# Altium PCB MONO65_A2.PcbDoc (part 4 of 4)
Units mm, origin at the board's own origin, x right, y up, seen from the top; angles counter-clockwise.
Board outline 304.6 x 95.05 mm, 2 copper layers (Component Side, Solder Side), stack 1.586 mm thick; 275 components, 185 nets, 1029 pads, 156 vias.
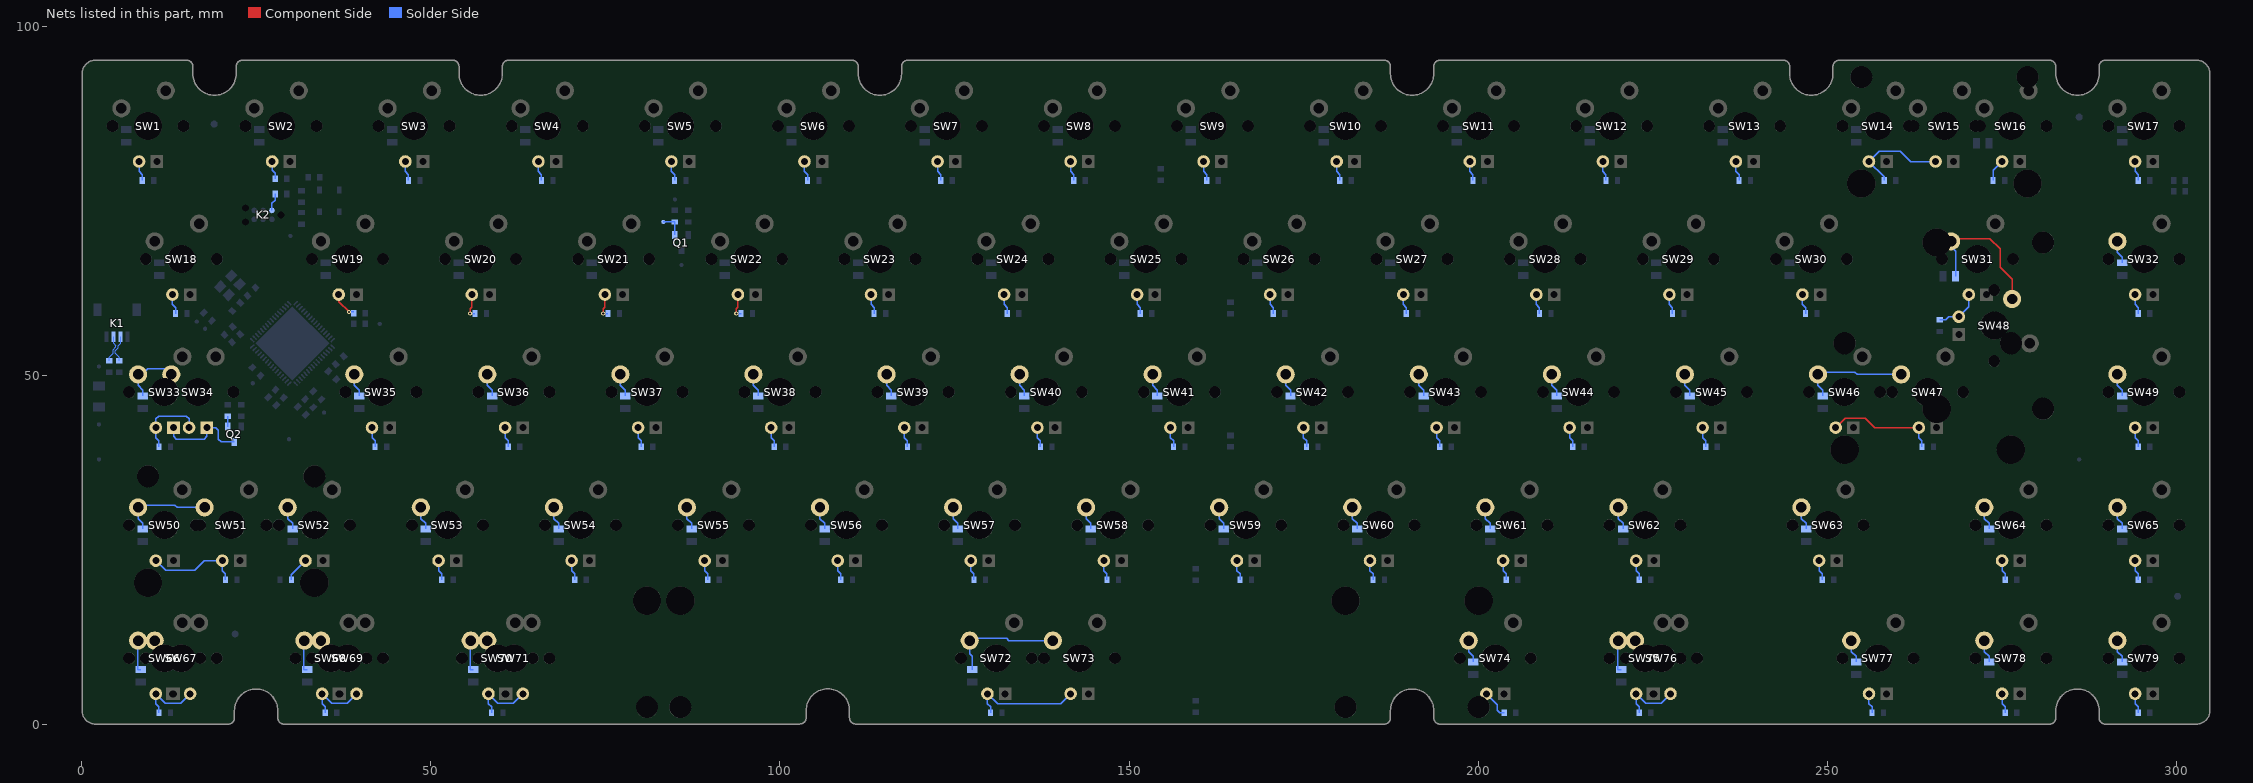
[diagram p3: the nets of this part, all layers, seen from the top]

## Via types
v1: diameter 0.6, hole 0.3, Component Side to Solder Side, tented both sides, 107 vias
v2: diameter 0.5, hole 0.2, Component Side to Solder Side, tented top, 49 vias

## Nets (pads, with @x,y where several pads share a name; then routed paths per layer and width w, separated by ;. In a path a pad name is that pad's centre, name@x,y a point inside that pad or via, vN(x,y) a via of type N, cw(c..) or ccw(c..) an arc to the next point about the centre after c; other vN are vias at no path point) (continued)
NetD32_2: D32.2 SW32.1 | length 3.3
  Solder Side w0.2: SW32.1@291.465,69.215 291.465,67.635 292.15,66.95 D32.2@292.15,66.15
NetD33_2: D33.2 SW33.1 SW34.1 | length 8.8
  Solder Side w0.2: D33.2@8.782,47.1 8.782,47.9 8.096,48.585 SW33.1@8.096,50.165 8.719,50.165 9.504,50.95 12.074,50.95 SW34.1@12.859,50.165
NetD35_2: D35.2 SW35.1 | length 3.3
  Solder Side w0.2: SW35.1@39.053,50.165 39.053,48.585 39.738,47.9 D35.2@39.738,47.1
NetD36_2: D36.2 SW36.1 | length 3.3
  Solder Side w0.2: SW36.1@58.103,50.165 58.103,48.585 58.788,47.9 D36.2@58.788,47.1
NetD37_2: D37.2 SW37.1 | length 3.3
  Solder Side w0.2: SW37.1@77.153,50.165 77.153,48.585 77.838,47.9 D37.2@77.838,47.1
NetD38_2: D38.2 SW38.1 | length 3.3
  Solder Side w0.2: SW38.1@96.203,50.165 96.203,48.585 96.888,47.9 D38.2@96.888,47.1
NetD39_2: D39.2 SW39.1 | length 3.3
  Solder Side w0.2: SW39.1@115.253,50.165 115.253,48.585 115.938,47.9 D39.2@115.938,47.1
NetD40_2: D40.2 SW40.1 | length 3.3
  Solder Side w0.2: SW40.1@134.303,50.165 134.303,48.585 134.988,47.9 D40.2@134.988,47.1
NetD41_2: D41.2 SW41.1 | length 3.3
  Solder Side w0.2: SW41.1@153.353,50.165 153.353,48.585 154.038,47.9 D41.2@154.038,47.1
NetD42_2: D42.2 SW42.1 | length 3.3
  Solder Side w0.2: SW42.1@172.403,50.165 172.403,48.585 173.088,47.9 D42.2@173.088,47.1
NetD43_2: D43.2 SW43.1 | length 3.3
  Solder Side w0.2: SW43.1@191.453,50.165 191.453,48.585 192.138,47.9 D43.2@192.138,47.1
NetD44_2: D44.2 SW44.1 | length 3.3
  Solder Side w0.2: SW44.1@210.503,50.165 210.503,48.585 211.188,47.9 D44.2@211.188,47.1
NetD45_2: D45.2 SW45.1 | length 3.3
  Solder Side w0.2: SW45.1@229.553,50.165 229.553,48.585 230.238,47.9 D45.2@230.238,47.1
NetD46_2: D46.2 SW46.1 SW47.1 | length 15.5
  Solder Side w0.2: D46.2@249.288,47.1 249.288,47.9 248.603,48.585 SW46.1@248.603,50.165 248.938,50.5 253.894,50.5 254.229,50.165 SW47.1@260.509,50.165
NetD48_2: D48.2 SW31.1 SW48.1 | length 20.6
  Component Side w0.2: SW31.1@267.929,69.215 268.289,69.575 273.225,69.575 274.675,68.125 274.675,65.5 276.384,63.791 SW48.1@276.384,60.96
  Solder Side w0.2: SW31.1@267.652,69.215 267.652,68.435 268.311,67.777 D48.2@268.311,64.225
NetD49_2: D49.2 SW49.1 | length 3.3
  Solder Side w0.2: SW49.1@291.465,50.165 291.465,48.585 292.15,47.9 D49.2@292.15,47.1
NetD50_2: D50.2 SW50.1 SW51.1 | length 13.2
  Solder Side w0.2: D50.2@8.782,28.05 8.782,28.85 8.097,29.535 SW50.1@8.097,31.115 8.432,31.45 13.388,31.45 13.723,31.115 SW51.1@17.622,31.115
NetD52_2: D52.2 SW52.1 | length 3.3
  Solder Side w0.2: SW52.1@29.528,31.115 29.528,29.535 30.213,28.85 D52.2@30.213,28.05
NetD53_2: D53.2 SW53.1 | length 3.3
  Solder Side w0.2: SW53.1@48.578,31.115 48.578,29.535 49.263,28.85 D53.2@49.263,28.05
NetD54_2: D54.2 SW54.1 | length 3.3
  Solder Side w0.2: SW54.1@67.628,31.115 67.628,29.535 68.313,28.85 D54.2@68.313,28.05
NetD55_2: D55.2 SW55.1 | length 3.3
  Solder Side w0.2: SW55.1@86.678,31.115 86.678,29.535 87.363,28.85 D55.2@87.363,28.05
NetD56_2: D56.2 SW56.1 | length 3.3
  Solder Side w0.2: SW56.1@105.728,31.115 105.728,29.535 106.413,28.85 D56.2@106.413,28.05
NetD57_2: D57.2 SW57.1 | length 3.3
  Solder Side w0.2: SW57.1@124.778,31.115 124.778,29.535 125.463,28.85 D57.2@125.463,28.05
NetD58_2: D58.2 SW58.1 | length 3.3
  Solder Side w0.2: SW58.1@143.828,31.115 143.828,29.535 144.513,28.85 D58.2@144.513,28.05
NetD59_2: D59.2 SW59.1 | length 3.3
  Solder Side w0.2: SW59.1@162.878,31.115 162.878,29.535 163.563,28.85 D59.2@163.563,28.05
NetD60_2: D60.2 SW60.1 | length 3.3
  Solder Side w0.2: SW60.1@181.928,31.115 181.928,29.535 182.613,28.85 D60.2@182.613,28.05
NetD61_2: D61.2 SW61.1 | length 3.3
  Solder Side w0.2: SW61.1@200.978,31.115 200.978,29.535 201.663,28.85 D61.2@201.663,28.05
NetD62_2: D62.2 SW62.1 | length 3.3
  Solder Side w0.2: SW62.1@220.028,31.115 220.028,29.535 220.713,28.85 D62.2@220.713,28.05
NetD63_2: D63.2 SW63.1 | length 3.3
  Solder Side w0.2: SW63.1@246.222,31.115 246.222,29.535 246.907,28.85 D63.2@246.907,28.05
NetD64_2: D64.2 SW64.1 | length 3.3
  Solder Side w0.2: SW64.1@272.416,31.115 272.416,29.535 273.101,28.85 D64.2@273.101,28.05
NetD65_2: D65.2 SW65.1 | length 3.3
  Solder Side w0.2: SW65.1@291.465,31.115 291.465,29.535 292.15,28.85 D65.2@292.15,28.05
NetD66_2: D66.2 SW66.1 SW67.1 | length 7
  Component Side w0.3: SW66.1@8.097,12.065 SW67.1@10.478,12.065
  Solder Side w0.2: SW66.1@8.097,12.065 8.025,11.993 8.025,7.95 8.075,7.9 D66.2@8.482,7.9
NetD68_2: D68.2 SW68.1 SW69.1 | length 7
  Component Side w0.2: SW68.1@31.909,12.065 SW69.1@34.29,12.065
  Solder Side w0.2: SW68.1@31.909,12.065 31.837,11.993 31.837,7.95 31.887,7.9 D68.2@32.294,7.9
NetD70_2: D70.2 SW70.1 SW71.1 | length 7
  Component Side w0.2: SW70.1@55.721,12.065 SW71.1@58.102,12.065
  Solder Side w0.2: SW70.1@55.721,12.065 55.649,11.993 55.649,7.95 55.699,7.9 D70.2@56.106,7.9
NetD72_2: D72.2 SW72.1 SW73.1 | length 16.5
  Solder Side w0.2: D72.2@127.544,7.9 127.544,9.8 127.159,10.185 SW72.1@127.159,12.065 127.494,12.4 132.45,12.4 132.785,12.065 SW73.1@139.065,12.065
NetD74_2: D74.2 SW74.1 | length 3.3
  Solder Side w0.2: SW74.1@198.597,12.065 198.597,10.485 199.282,9.8 D74.2@199.282,9
NetD75_2: D75.2 SW75.1 SW76.1 | length 7
  Component Side w0.3: SW75.1@220.028,12.065 SW76.1@222.409,12.065
  Solder Side w0.2: SW75.1@220.028,12.065 219.956,11.993 219.956,7.95 220.006,7.9 D75.2@220.413,7.9
NetD77_2: D77.2 SW77.1 | length 3.3
  Solder Side w0.2: SW77.1@253.365,12.065 253.365,10.485 254.051,9.8 D77.2@254.051,9
NetD78_2: D78.2 SW78.1 | length 3.3
  Solder Side w0.2: SW78.1@272.415,12.065 272.415,10.485 273.1,9.8 D78.2@273.1,9
NetD79_2: D79.2 SW79.1 | length 3.3
  Solder Side w0.2: SW79.1@291.465,12.065 291.465,10.485 292.15,9.8 D79.2@292.15,9
NetK2_2: K2.2 R7.2 | length 2.6
  Solder Side w0.2: K2.2@27.27,73.635 27.27,74.651 27.75,75.131 R7.2@27.75,76
NetQ1_1: Q1.1 R13.2 TP12.1 | length 3.5
  Solder Side w0.2: TP12.1@83.3,72 R13.2@84.95,72 Q1.1@84.95,70.125
NetQ2_1: Q2.1 R15.2 | length 1.5
  Solder Side w0.2: Q2.1@20.95,42.7 R15.2@20.95,44.175
NetQ2_3: Q2.3 SW33.4 SW34.4 | length 13.2
  Solder Side w0.2: SW33.4@13.176,42.545 13.176,41.284 13.571,40.89 17.545,40.89 17.939,41.284 SW34.4@17.939,42.545 19.255,42.545 19.608,42.192 19.608,40.9 20.008,40.5 Q2.3@21.9,40.5
NetR11_2: R11.2 SW33.3 SW34.3 | length 10.5
  Solder Side w0.2: R11.2@11.082,39.825 11.082,40.681 10.636,41.127 SW33.3@10.636,42.545 10.636,43.806 11.031,44.2 15.005,44.2 15.399,43.806 SW34.3@15.399,42.545
NetR17_2: R17.2 SW1.3 | length 2.9
  Solder Side w0.2: SW1.3@8.255,80.645 8.255,79.227 8.7,78.781 R17.2@8.7,77.925
NetR18_2: R18.2 SW2.3 | length 2.6
  Solder Side w0.2: SW2.3@27.305,80.645 27.305,79.395 27.75,78.95 R18.2@27.75,78.2
NetR19_2: R19.2 SW3.3 | length 2.9
  Solder Side w0.2: SW3.3@46.355,80.645 46.355,79.227 46.8,78.781 R19.2@46.8,77.925
NetR20_2: R20.2 SW4.3 | length 2.9
  Solder Side w0.2: SW4.3@65.405,80.645 65.405,79.227 65.85,78.781 R20.2@65.85,77.925
NetR21_2: R21.2 SW5.3 | length 2.9
  Solder Side w0.2: SW5.3@84.455,80.645 84.455,79.227 84.9,78.781 R21.2@84.9,77.925
NetR22_2: R22.2 SW6.3 | length 2.9
  Solder Side w0.2: SW6.3@103.505,80.645 103.505,79.227 103.95,78.781 R22.2@103.95,77.925
NetR23_2: R23.2 SW7.3 | length 2.9
  Solder Side w0.2: SW7.3@122.555,80.645 122.555,79.227 123,78.781 R23.2@123,77.925
NetR24_2: R24.2 SW8.3 | length 2.9
  Solder Side w0.2: SW8.3@141.605,80.645 141.605,79.227 142.05,78.781 R24.2@142.05,77.925
NetR25_2: R25.2 SW9.3 | length 2.9
  Solder Side w0.2: SW9.3@160.655,80.645 160.655,79.227 161.1,78.781 R25.2@161.1,77.925
NetR26_2: R26.2 SW10.3 | length 2.9
  Solder Side w0.2: SW10.3@179.705,80.645 179.705,79.227 180.15,78.781 R26.2@180.15,77.925
NetR27_2: R27.2 SW11.3 | length 2.9
  Solder Side w0.2: SW11.3@198.755,80.645 198.755,79.227 199.2,78.781 R27.2@199.2,77.925
NetR28_2: R28.2 SW12.3 | length 2.9
  Solder Side w0.2: SW12.3@217.805,80.645 217.805,79.227 218.25,78.781 R28.2@218.25,77.925
NetR29_2: R29.2 SW13.3 | length 2.9
  Solder Side w0.2: SW13.3@236.855,80.645 236.855,79.227 237.3,78.781 R29.2@237.3,77.925
NetR30_2: R30.2 SW14.3 SW15.3 | length 14.3
  Solder Side w0.2: R30.2@258.075,77.925 258.075,78.475 SW14.3@255.905,80.645 257.36,82.1 260.4,82.1 261.855,80.645 SW15.3@265.43,80.645
NetR32_2: R32.2 SW17.3 | length 2.9
  Solder Side w0.2: SW17.3@294.005,80.645 294.005,79.227 294.45,78.781 R32.2@294.45,77.925
NetR33_2: R33.2 SW18.3 | length 2.9
  Solder Side w0.2: SW18.3@13.017,61.595 13.017,60.177 13.463,59.731 R33.2@13.462,58.875
NetR34_2: R34.2 SW19.3 | length 3.8
  Component Side w0.2: SW19.3@36.83,61.595 36.83,60.57 v1(38.3,59.1)
  Solder Side w0.2: v1(38.3,59.1) R34.2@38.975,59.1
NetR35_2: R35.2 SW20.3 | length 3.5
  Component Side w0.2: v1(55.65,58.875) 55.65,59.57 55.88,59.8 SW20.3@55.88,61.595
  Solder Side w0.2: v1(55.65,58.875) R35.2@56.325,58.875
NetR36_2: R36.2 SW21.3 | length 3.5
  Component Side w0.2: v1(74.7,58.875) 74.7,59.57 74.93,59.8 SW21.3@74.93,61.595
  Solder Side w0.2: v1(74.7,58.875) R36.2@75.375,58.875
NetR37_2: R37.2 SW22.3 | length 3.5
  Component Side w0.2: v1(93.75,58.875) 93.75,59.57 93.98,59.8 SW22.3@93.98,61.595
  Solder Side w0.2: v1(93.75,58.875) R37.2@94.425,58.875
NetR38_2: R38.2 SW23.3 | length 2.9
  Solder Side w0.2: SW23.3@113.03,61.595 113.03,60.177 113.475,59.731 R38.2@113.475,58.875
NetR39_2: R39.2 SW24.3 | length 2.9
  Solder Side w0.2: SW24.3@132.08,61.595 132.08,60.177 132.525,59.731 R39.2@132.525,58.875
NetR40_2: R40.2 SW25.3 | length 2.9
  Solder Side w0.2: SW25.3@151.13,61.595 151.13,60.177 151.575,59.731 R40.2@151.575,58.875
NetR41_2: R41.2 SW26.3 | length 2.9
  Solder Side w0.2: SW26.3@170.18,61.595 170.18,60.177 170.625,59.731 R41.2@170.625,58.875
NetR42_2: R42.2 SW27.3 | length 2.9
  Solder Side w0.2: SW27.3@189.23,61.595 189.23,60.177 189.675,59.731 R42.2@189.675,58.875
NetR43_2: R43.2 SW28.3 | length 2.9
  Solder Side w0.2: SW28.3@208.28,61.595 208.28,60.177 208.725,59.731 R43.2@208.725,58.875
NetR44_2: R44.2 SW29.3 | length 2.9
  Solder Side w0.2: SW29.3@227.33,61.595 227.33,60.177 227.775,59.731 R44.2@227.775,58.875
NetR45_2: R45.2 SW30.3 | length 2.9
  Solder Side w0.2: SW30.3@246.38,61.595 246.38,60.177 246.825,59.731 R45.2@246.825,58.875
NetR46_2: R46.2 SW16.3 | length 3.3
  Solder Side w0.2: R46.2@273.675,77.925 273.675,79.365 SW16.3@274.955,80.645
NetR47_2: R47.2 SW32.3 | length 2.9
  Solder Side w0.2: SW32.3@294.005,61.595 294.005,60.177 294.45,59.731 R47.2@294.45,58.875
NetR48_2: R48.2 SW35.3 | length 2.9
  Solder Side w0.2: SW35.3@41.593,42.545 41.593,41.127 42.038,40.681 R48.2@42.038,39.825
NetR49_2: R49.2 SW36.3 | length 2.9
  Solder Side w0.2: SW36.3@60.643,42.545 60.643,41.127 61.088,40.681 R49.2@61.088,39.825
NetR50_2: R50.2 SW37.3 | length 2.9
  Solder Side w0.2: SW37.3@79.693,42.545 79.693,41.127 80.138,40.681 R50.2@80.138,39.825
NetR51_2: R51.2 SW38.3 | length 2.9
  Solder Side w0.2: SW38.3@98.743,42.545 98.743,41.127 99.188,40.681 R51.2@99.188,39.825
NetR52_2: R52.2 SW39.3 | length 2.9
  Solder Side w0.2: SW39.3@117.793,42.545 117.793,41.127 118.238,40.681 R52.2@118.238,39.825
NetR53_2: R53.2 SW40.3 | length 2.9
  Solder Side w0.2: SW40.3@136.843,42.545 136.843,41.127 137.288,40.681 R53.2@137.288,39.825
NetR54_2: R54.2 SW41.3 | length 2.9
  Solder Side w0.2: SW41.3@155.893,42.545 155.893,41.127 156.338,40.681 R54.2@156.338,39.825
NetR55_2: R55.2 SW42.3 | length 2.9
  Solder Side w0.2: SW42.3@174.943,42.545 174.943,41.127 175.388,40.681 R55.2@175.388,39.825
NetR56_2: R56.2 SW43.3 | length 2.9
  Solder Side w0.2: SW43.3@193.993,42.545 193.993,41.127 194.438,40.681 R56.2@194.438,39.825
NetR57_2: R57.2 SW44.3 | length 2.9
  Solder Side w0.2: SW44.3@213.043,42.545 213.043,41.127 213.488,40.681 R57.2@213.488,39.825
NetR58_2: R58.2 SW45.3 | length 2.9
  Solder Side w0.2: SW45.3@232.093,42.545 232.093,41.127 232.538,40.681 R58.2@232.538,39.825
NetR59_2: R59.2 SW46.3 SW47.3 | length 15.9
  Component Side w0.2: SW46.3@251.143,42.545 252.498,43.9 255.4,43.9 256.755,42.545 SW47.3@263.049,42.545
  Solder Side w0.2: SW47.3@263.049,42.545 263.049,41.127 263.494,40.681 R59.2@263.494,39.825
NetR61_2: R61.2 SW31.3 SW48.3 | length 6.7
  Solder Side w0.2: R61.2@266.044,57.975 266.9,57.975 267.346,58.42 SW48.3@268.764,58.42 270.192,59.848 SW31.3@270.192,61.595
NetR63_2: R63.2 SW49.3 | length 2.9
  Solder Side w0.2: SW49.3@294.005,42.545 294.005,41.127 294.45,40.681 R63.2@294.45,39.825
NetR64_2: R64.2 SW50.3 SW51.3 | length 13.6
  Solder Side w0.2: SW50.3@10.637,23.495 12.032,22.1 16.2,22.1 17.595,23.495 SW51.3@20.162,23.495 20.162,22.077 20.607,21.631 R64.2@20.607,20.775
NetR66_2: R66.2 SW52.3 | length 3.6
  Solder Side w0.2: R66.2@30.057,20.775 30.057,21.484 SW52.3@32.068,23.495
NetR67_2: R67.2 SW53.3 | length 2.9
  Solder Side w0.2: SW53.3@51.118,23.495 51.118,22.077 51.563,21.631 R67.2@51.563,20.775
NetR68_2: R68.2 SW54.3 | length 2.9
  Solder Side w0.2: SW54.3@70.168,23.495 70.168,22.077 70.613,21.631 R68.2@70.613,20.775
NetR69_2: R69.2 SW55.3 | length 2.9
  Solder Side w0.2: SW55.3@89.218,23.495 89.218,22.077 89.663,21.631 R69.2@89.663,20.775
NetR70_2: R70.2 SW56.3 | length 2.9
  Solder Side w0.2: SW56.3@108.268,23.495 108.268,22.077 108.713,21.631 R70.2@108.713,20.775
NetR71_2: R71.2 SW57.3 | length 2.9
  Solder Side w0.2: SW57.3@127.318,23.495 127.318,22.077 127.763,21.631 R71.2@127.763,20.775
NetR72_2: R72.2 SW58.3 | length 2.9
  Solder Side w0.2: SW58.3@146.368,23.495 146.368,22.077 146.813,21.631 R72.2@146.813,20.775
NetR73_2: R73.2 SW59.3 | length 2.9
  Solder Side w0.2: SW59.3@165.418,23.495 165.418,22.077 165.863,21.631 R73.2@165.863,20.775
NetR74_2: R74.2 SW60.3 | length 2.9
  Solder Side w0.2: SW60.3@184.468,23.495 184.468,22.077 184.913,21.631 R74.2@184.913,20.775
NetR75_2: R75.2 SW61.3 | length 2.9
  Solder Side w0.2: SW61.3@203.518,23.495 203.518,22.077 203.963,21.631 R75.2@203.963,20.775
NetR76_2: R76.2 SW62.3 | length 2.9
  Solder Side w0.2: SW62.3@222.568,23.495 222.568,22.077 223.013,21.631 R76.2@223.013,20.775
NetR77_2: R77.2 SW63.3 | length 2.9
  Solder Side w0.2: SW63.3@248.762,23.495 248.762,22.077 249.207,21.631 R77.2@249.207,20.775
NetR78_2: R78.2 SW64.3 | length 2.9
  Solder Side w0.2: SW64.3@274.956,23.495 274.956,22.077 275.401,21.631 R78.2@275.401,20.775
NetR79_2: R79.2 SW65.3 | length 2.9
  Solder Side w0.2: SW65.3@294.005,23.495 294.005,22.077 294.45,21.631 R79.2@294.45,20.775
NetR80_2: R80.2 SW66.3 SW67.3 | length 8.9
  Solder Side w0.2: R80.2@11.082,1.725 11.082,2.581 10.637,3.027 SW66.3@10.637,4.445 11.982,3.1 14.213,3.1 SW67.3@15.558,4.445
NetR82_2: R82.2 SW68.3 SW69.3 | length 8.9
  Solder Side w0.2: R82.2@34.894,1.725 34.894,2.581 34.449,3.027 SW68.3@34.449,4.445 35.794,3.1 38.025,3.1 SW69.3@39.37,4.445
NetR84_2: R84.2 SW70.3 SW71.3 | length 8.9
  Solder Side w0.2: R84.2@58.706,1.725 58.706,2.581 58.261,3.027 SW70.3@58.261,4.445 59.606,3.1 61.837,3.1 SW71.3@63.182,4.445
NetR86_2: R86.2 SW72.3 SW73.3 | length 16
  Solder Side w0.2: R86.2@130.144,1.725 130.144,2.581 129.699,3.027 SW72.3@129.699,4.445 131.144,3 140.16,3 SW73.3@141.605,4.445
NetR88_2: R88.2 SW74.3 | length 4.1
  Solder Side w0.2: SW74.3@201.137,4.445 202.675,2.907 202.675,2.1 203.05,1.725 R88.2@203.675,1.725
NetR89_2: R89.2 SW75.3 SW76.3 | length 8.9
  Solder Side w0.2: R89.2@223.013,1.725 223.013,2.581 222.568,3.027 SW75.3@222.568,4.445 223.913,3.1 226.144,3.1 SW76.3@227.489,4.445
NetR91_2: R91.2 SW77.3 | length 2.9
  Solder Side w0.2: SW77.3@255.905,4.445 255.905,3.027 256.351,2.581 R91.2@256.35,1.725
NetR92_2: R92.2 SW78.3 | length 2.9
  Solder Side w0.2: SW78.3@274.955,4.445 274.955,3.027 275.4,2.581 R92.2@275.4,1.725
NetR93_2: R93.2 SW79.3 | length 2.9
  Solder Side w0.2: SW79.3@294.005,4.445 294.005,3.027 294.45,2.581 R93.2@294.45,1.725
USB_N: K1.2 R1.1 | length 3.9
  Solder Side w0.135: R1.1@4,52.125 4,52.654 4.533,53.187 4.533,53.692 4.933,54.092 4.933,54.292 4.6,54.625 K1.2@4.6,55.55
USB_P: K1.3 R2.1 | length 4
  Solder Side w0.135: R2.1@5.4,52.125 5.4,52.654 4.868,53.187 4.868,53.553 5.268,53.953 5.268,54.3 5.275,54.3 5.6,54.625 K1.3@5.6,55.55
pads on no net: FID1.0 FID2.0 FID3.0 FID4.0 IC1.1 IC1.2 IC1.9 IC1.10 IC1.14 IC1.15 IC1.18 IC1.19 IC1.25 IC1.26 IC1.27 IC1.30 IC1.31 IC1.33 IC1.34 IC1.40 IC1.41 IC1.42 IC1.51 IC1.56 IC1.58 IC1.61 K2.0 SW1.M1 SW2.M1 SW3.M1 SW4.M1 SW5.M1 SW6.M1 SW7.M1 SW8.M1 SW9.M1 SW10.M1 SW11.M1 SW12.M1 SW13.M1 SW14.M1 SW15.M1 SW16.M1 SW17.M1 SW18.M1 SW19.M1 SW20.M1 SW21.M1 SW22.M1 SW23.M1 SW24.M1 SW25.M1 SW26.M1 SW27.M1 SW28.M1 SW29.M1 SW30.M1 SW31.M1 SW32.M1 SW33.M1 SW34.M1 SW35.M1 SW36.M1 SW37.M1 SW38.M1 SW39.M1 SW40.M1 SW41.M1 SW42.M1 SW43.M1 SW44.M1 SW45.M1 SW46.M1 SW47.M1 SW48.M1 SW49.M1 SW50.M1 SW51.M1 SW52.M1 SW53.M1 SW54.M1 SW55.M1 SW56.M1 SW57.M1 SW58.M1 SW59.M1 SW60.M1 SW61.M1 SW62.M1 SW63.M1 SW64.M1 SW65.M1 SW66.M1 SW67.M1 SW68.M1 SW69.M1 SW70.M1 SW71.M1 SW72.M1 SW73.M1 SW74.M1 SW75.M1 SW76.M1 SW77.M1 SW78.M1 SW79.M1

## Polygon pours and split planes (outlines as drawn)
5V_SYS on Solder Side "5V_SYS_L02_P008" (solid, remove dead copper, pour order 8): 0,0 304.8,0 304.8,95.249 304.799,95.25 0,95.25
GND on Solder Side "GND_L02_P006" (solid, remove dead copper, pour order 6): 17.7,62.847 21.203,66.35 23.403,66.35 26.311,63.441 26.311,59.772 24.257,57.718 20.775,57.718 17.7,60.793
GND on Component Side "GND_L01_P002" (solid, remove dead copper, pour order 2): 0,0 304.8,0 304.8,95.249 304.1,95.249 304.1,95.25 0,95.25

## Keep-outs
Keep-Out Layer:
  lines w0.2: 0,2 ccw(c2.001,2.001) 2,0 ; 0,2 ccw(c2.001,2.001) 2,0 ; 0,2 0,93.25 ; 0,93.25 cw(c2.001,93.249) 2,95.25 ; 0,93.25 cw(c2.001,93.249) 2,95.25 ; 2,0 6.375,0 21.003,0 ; 2,95.25 12.675,95.25 15.05,95.249 ; 15.05,95.249 cw(c15.051,94.25) 16.05,94.249 ; 15.05,95.249 cw(c15.051,94.25) 16.05,94.249 ; 16.05,93.224 ccw(c19.05,93.225) 22.05,93.224 ; 16.05,93.224 ccw(c19.05,93.225) 22.05,93.224 ; 16.05,93.224 16.05,94.249 ; 21.003,0 ccw(c21.003,1) 22.003,1 ; 21.003,0 ccw(c21.003,1) 22.003,1 ; 22.003,1 22.003,2.025 ; 22.003,2.025 cw(c25.003,2.025) 28.003,2.025 ; 22.003,2.025 cw(c25.003,2.025) 28.003,2.025 ; 22.05,93.224 22.05,94.249 ; 22.05,94.249 cw(c23.049,94.25) 23.05,95.249 ; 22.05,94.249 cw(c23.049,94.25) 23.05,95.249 ; 23.05,95.249 53.15,95.25 ; 28.003,1 ccw(c29.003,1) 29.003,0 ; 28.003,1 ccw(c29.003,1) 29.003,0 ; 28.003,1 28.003,2.025 ; 29.003,0 94.565,0.015 102.851,0.015 ; 53.15,95.25 cw(c53.15,94.25) 54.15,94.249 ; 53.15,95.25 cw(c53.15,94.25) 54.15,94.249 ; 54.15,93.224 ccw(c57.15,93.225) 60.15,93.224 ; 54.15,93.224 ccw(c57.15,93.225) 60.15,93.224 ; 54.15,93.224 54.15,94.249 ; 60.15,93.224 60.15,94.249 ; 60.15,94.249 cw(c61.149,94.25) 61.15,95.249 ; 60.15,94.249 cw(c61.149,94.25) 61.15,95.249 ; 61.15,95.249 88.25,95.249 110.299,95.25 ; 102.851,0.015 ccw(c102.851,1.015) 103.851,1.015 ; 102.851,0.015 ccw(c102.851,1.015) 103.851,1.015 ; 103.851,1.015 103.851,2.04 ; 103.851,2.04 cw(c106.851,2.04) 109.851,2.04 ; 103.851,2.04 cw(c106.851,2.04) 109.851,2.04 ; 109.851,1.015 ccw(c110.877,1.026) 110.851,0 ; 109.851,1.015 ccw(c110.877,1.026) 110.851,0 ; 109.851,1.015 109.851,2.04 ; 110.299,95.25 cw(c110.3,94.25) 111.3,94.249 ; 110.299,95.25 cw(c110.3,94.25) 111.3,94.249 ; 110.851,0 186.5,0 ; 111.3,93.224 ccw(c114.3,93.225) 117.3,93.224 ; 111.3,93.224 ccw(c114.3,93.225) 117.3,93.224 ; 111.3,93.224 111.3,94.249 ; 117.3,93.224 117.3,94.249 ; 117.3,94.249 cw(c118.299,94.25) 118.3,95.249 ; 117.3,94.249 cw(c118.299,94.25) 118.3,95.249 ; 118.3,95.249 186.5,95.25 ; 186.5,0 ccw(c186.5,1) 187.5,1 ; 186.5,0 ccw(c186.5,1) 187.5,1 ; 186.5,95.25 cw(c186.5,94.25) 187.5,94.249 ; 186.5,95.25 cw(c186.5,94.25) 187.5,94.249 ; 187.5,1 187.5,2.025 ; 187.5,2.025 cw(c190.5,2.025) 193.5,2.025 ; 187.5,2.025 cw(c190.5,2.025) 193.5,2.025 ; 187.5,93.224 ccw(c190.5,93.225) 193.5,93.224 ; 187.5,93.224 ccw(c190.5,93.225) 193.5,93.224 ; 187.5,93.224 187.5,94.249 ; 193.5,1 ccw(c194.5,1) 194.5,0 ; 193.5,1 ccw(c194.5,1) 194.5,0 ; 193.5,1 193.5,2.025 ; 193.5,93.224 193.5,94.249 ; 193.5,94.249 cw(c194.499,94.25) 194.5,95.249 ; 193.5,94.249 cw(c194.499,94.25) 194.5,95.249 ; 194.5,0 281.75,0.001 ; 194.5,95.249 243.649,95.25 ; 243.649,95.25 cw(c243.65,94.25) 244.65,94.249 ; 243.649,95.25 cw(c243.65,94.25) 244.65,94.249 ; 244.65,93.224 ccw(c247.65,93.225) 250.65,93.224 ; 244.65,93.224 ccw(c247.65,93.225) 250.65,93.224 ; 244.65,93.224 244.65,94.249 ; 250.65,93.224 250.65,94.249 ; 250.65,94.249 cw(c251.649,94.25) 251.65,95.249 ; 250.65,94.249 cw(c251.649,94.25) 251.65,95.249 ; 251.65,95.249 281.75,95.25 ; 281.75,0.001 ccw(c281.751,1) 282.75,1.001 ; 281.75,0.001 ccw(c281.751,1) 282.75,1.001 ; 281.75,95.25 cw(c281.75,94.25) 282.75,94.249 ; 281.75,95.25 cw(c281.75,94.25) 282.75,94.249 ; 282.75,1.001 282.75,2.026 ; 282.75,2.026 cw(c285.75,2.025) 288.75,2.026 ; 282.75,2.026 cw(c285.75,2.025) 288.75,2.026 ; 282.75,93.224 ccw(c285.75,93.225) 288.75,93.224 ; 282.75,93.224 ccw(c285.75,93.225) 288.75,93.224 ; 282.75,93.224 282.75,94.249 ; 288.75,1.001 ccw(c289.749,1) 289.75,0.001 ; 288.75,1.001 ccw(c289.749,1) 289.75,0.001 ; 288.75,1.001 288.75,2.026 ; 288.75,93.224 288.75,94.249 ; 288.75,94.249 cw(c289.749,94.25) 289.75,95.249 ; 288.75,94.249 cw(c289.749,94.25) 289.75,95.249 ; 289.75,0.001 292.125,0 302.8,0 ; 289.75,95.249 292.125,95.249 302.8,95.25 ; 302.8,0 ccw(c302.799,2.001) 304.8,2 ; 302.8,0 ccw(c302.799,2.001) 304.8,2 ; 302.8,95.25 cw(c302.799,93.249) 304.8,93.25 ; 302.8,95.25 cw(c302.799,93.249) 304.8,93.25 ; 304.8,2 304.8,93.25

## Other copper
Component Side:
  pour cut-out: 100.616,9.528 100.441,9.815 100.294,10.12 100.177,10.44 100.091,10.774 100.039,11.12 100.021,11.387 100.021,11.565 100.039,11.832 100.091,12.178 100.177,12.511 100.294,12.831 100.441,13.136 100.616,13.423 100.816,13.691 101.041,13.939 101.288,14.164 101.556,14.364 101.844,14.539 102.148,14.685 102.468,14.802 102.802,14.888 103.148,14.941 103.415,14.959 103.593,14.959 103.86,14.941 104.206,14.888 104.54,14.802 104.86,14.685 105.164,14.539 105.452,14.364 105.72,14.164 105.967,13.939 106.192,13.691 106.392,13.423 106.567,13.136 106.714,12.831 106.831,12.511 106.917,12.178 106.969,11.832 106.987,11.565 106.987,11.387 106.969,11.12 106.917,10.774 106.831,10.44 106.714,10.12 106.567,9.815 106.392,9.528 106.192,9.26 105.967,9.013 105.72,8.788 105.452,8.587 105.164,8.413 104.86,8.266 104.54,8.149 104.206,8.063 103.86,8.01 103.593,7.992 103.415,7.992 103.148,8.01 102.802,8.063 102.468,8.149 102.148,8.266 101.844,8.413 101.556,8.587 101.288,8.788 101.041,9.013 100.816,9.26
  pour cut-out: 113.388,9.528 113.213,9.815 113.067,10.12 112.95,10.44 112.864,10.774 112.811,11.12 112.793,11.387 112.793,11.565 112.811,11.832 112.864,12.178 112.95,12.511 113.067,12.831 113.213,13.136 113.388,13.423 113.588,13.691 113.813,13.939 114.06,14.164 114.329,14.364 114.616,14.539 114.92,14.685 115.24,14.802 115.574,14.888 115.92,14.941 116.187,14.959 116.365,14.959 116.632,14.941 116.978,14.888 117.312,14.802 117.632,14.685 117.937,14.539 118.224,14.364 118.492,14.164 118.739,13.939 118.964,13.691 119.165,13.423 119.339,13.136 119.486,12.831 119.603,12.511 119.689,12.178 119.741,11.832 119.759,11.565 119.759,11.387 119.741,11.12 119.689,10.774 119.603,10.44 119.486,10.12 119.339,9.815 119.165,9.528 118.964,9.26 118.739,9.013 118.492,8.788 118.224,8.587 117.937,8.413 117.632,8.266 117.312,8.149 116.978,8.063 116.632,8.01 116.365,7.992 116.187,7.992 115.92,8.01 115.574,8.063 115.24,8.149 114.92,8.266 114.616,8.413 114.329,8.587 114.06,8.788 113.813,9.013 113.588,9.26
  pour cut-out: 95.009,8.464 94.91,8.645 94.848,8.846 94.826,9.008 94.826,13.943 94.848,14.105 94.91,14.306 95.009,14.487 95.139,14.646 95.298,14.776 95.479,14.875 95.68,14.937 95.842,14.959 95.95,14.959 96.111,14.937 96.312,14.875 96.494,14.776 96.652,14.646 96.782,14.487 96.881,14.306 96.943,14.105 96.965,13.943 96.965,9.008 96.943,8.846 96.881,8.645 96.782,8.464 96.652,8.306 96.494,8.175 96.312,8.076 96.111,8.014 95.95,7.992 95.842,7.992 95.68,8.014 95.479,8.076 95.298,8.175 95.139,8.306
  pour cut-out: 110.226,8.464 110.127,8.645 110.065,8.846 110.043,9.008 110.043,13.943 110.065,14.105 110.127,14.306 110.226,14.487 110.356,14.646 110.514,14.776 110.696,14.875 110.897,14.937 111.058,14.959 111.166,14.959 111.328,14.937 111.529,14.875 111.71,14.776 111.868,14.646 111.999,14.487 112.098,14.306 112.16,14.105 112.182,13.943 112.182,9.008 112.16,8.846 112.098,8.645 111.999,8.464 111.868,8.306 111.71,8.175 111.529,8.076 111.328,8.014 111.166,7.992 111.058,7.992 110.897,8.014 110.696,8.076 110.514,8.175 110.356,8.306
  pour cut-out: 107.62,8.846 107.598,9.008 107.598,13.943 107.62,14.105 107.683,14.306 107.781,14.487 107.912,14.646 108.07,14.776 108.252,14.875 108.452,14.937 108.614,14.959 108.722,14.959 108.883,14.937 109.084,14.875 109.266,14.776 109.424,14.646 109.555,14.487 109.653,14.306 109.716,14.105 109.737,13.943 109.737,9.008 109.716,8.846 109.653,8.645 109.555,8.464 109.424,8.306 109.266,8.175 109.084,8.076 108.883,8.014 108.722,7.992 108.614,7.992 108.452,8.014 108.252,8.076 108.07,8.175 107.912,8.306 107.781,8.464 107.683,8.645
  pour cut-out: 97.453,8.464 97.355,8.645 97.292,8.846 97.271,9.008 97.271,13.943 97.292,14.105 97.355,14.306 97.453,14.487 97.584,14.646 97.742,14.776 97.924,14.875 98.125,14.937 98.286,14.959 98.394,14.959 98.556,14.937 98.756,14.875 98.938,14.776 99.096,14.646 99.227,14.487 99.325,14.306 99.388,14.105 99.41,13.943 99.41,9.008 99.388,8.846 99.325,8.645 99.227,8.464 99.096,8.306 98.938,8.175 98.756,8.076 98.556,8.014 98.394,7.992 98.286,7.992 98.125,8.014 97.924,8.076 97.742,8.175 97.584,8.306
  pour cut-out: 92.564,8.464 92.466,8.645 92.404,8.846 92.382,9.008 92.382,13.943 92.404,14.105 92.466,14.306 92.564,14.487 92.695,14.646 92.853,14.776 93.035,14.875 93.236,14.937 93.397,14.959 93.505,14.959 93.667,14.937 93.867,14.875 94.049,14.776 94.207,14.646 94.338,14.487 94.437,14.306 94.499,14.105 94.521,13.943 94.521,9.008 94.499,8.846 94.437,8.645 94.338,8.464 94.207,8.306 94.049,8.175 93.867,8.076 93.667,8.014 93.505,7.992 93.397,7.992 93.236,8.014 93.035,8.076 92.853,8.175 92.695,8.306
  pour cut-out: 119.916,8.149 119.802,8.319 119.759,8.475 119.759,8.579 119.802,8.735 119.916,8.905 120.086,9.02 120.242,9.062 120.346,9.062 120.502,9.02 120.672,8.905 120.787,8.735 120.829,8.579 120.829,8.475 120.787,8.319 120.672,8.149 120.502,8.034 120.346,7.992 120.242,7.992 120.086,8.034
  pour cut-out: 1.5,1.5 4.75,1.5 4.75,2.925 1.5,2.925
  text "GND" at 1.5,1.5 h1.5
Solder Side:
  pour cut-out: 92.766,9.273 92.88,9.443 92.922,9.599 92.922,9.703 92.88,9.859 92.766,10.029 92.596,10.144 92.44,10.186 92.336,10.186 92.179,10.144 92.01,10.029 91.895,9.859 91.853,9.703 91.853,9.599 91.895,9.443 92.01,9.273 92.179,9.159 92.336,9.117 92.44,9.117 92.596,9.159
  pour cut-out: 102.456,9.588 102.555,9.77 102.617,9.971 102.639,10.132 102.639,15.068 102.617,15.229 102.555,15.43 102.456,15.612 102.326,15.77 102.167,15.901 101.986,15.999 101.785,16.062 101.623,16.083 101.516,16.083 101.354,16.062 101.153,15.999 100.972,15.901 100.813,15.77 100.683,15.612 100.584,15.43 100.522,15.229 100.5,15.068 100.5,10.132 100.522,9.971 100.584,9.77 100.683,9.588 100.813,9.43 100.972,9.299 101.153,9.201 101.354,9.138 101.516,9.117 101.623,9.117 101.785,9.138 101.986,9.201 102.167,9.299 102.326,9.43
  pour cut-out: 105.062,9.971 105.083,10.132 105.083,15.068 105.062,15.229 104.999,15.43 104.901,15.612 104.77,15.77 104.612,15.901 104.43,15.999 104.229,16.062 104.068,16.083 103.96,16.083 103.798,16.062 103.598,15.999 103.416,15.901 103.258,15.77 103.127,15.612 103.029,15.43 102.966,15.229 102.944,15.068 102.944,10.132 102.966,9.971 103.029,9.77 103.127,9.588 103.258,9.43 103.416,9.299 103.598,9.201 103.798,9.138 103.96,9.117 104.068,9.117 104.229,9.138 104.43,9.201 104.612,9.299 104.77,9.43 104.901,9.588 104.999,9.77
  pour cut-out: 115.228,9.588 115.327,9.77 115.389,9.971 115.411,10.132 115.411,15.068 115.389,15.229 115.327,15.43 115.228,15.612 115.098,15.77 114.94,15.901 114.758,15.999 114.557,16.062 114.396,16.083 114.288,16.083 114.126,16.062 113.925,15.999 113.744,15.901 113.586,15.77 113.455,15.612 113.356,15.43 113.294,15.229 113.272,15.068 113.272,10.132 113.294,9.971 113.356,9.77 113.455,9.588 113.586,9.43 113.744,9.299 113.925,9.201 114.126,9.138 114.288,9.117 114.396,9.117 114.557,9.138 114.758,9.201 114.94,9.299 115.098,9.43
  pour cut-out: 117.673,9.588 117.772,9.77 117.834,9.971 117.856,10.132 117.856,15.068 117.834,15.229 117.772,15.43 117.673,15.612 117.542,15.77 117.384,15.901 117.202,15.999 117.002,16.062 116.84,16.083 116.732,16.083 116.571,16.062 116.37,15.999 116.188,15.901 116.03,15.77 115.899,15.612 115.801,15.43 115.739,15.229 115.717,15.068 115.717,10.132 115.739,9.971 115.801,9.77 115.899,9.588 116.03,9.43 116.188,9.299 116.37,9.201 116.571,9.138 116.732,9.117 116.84,9.117 117.002,9.138 117.202,9.201 117.384,9.299 117.542,9.43
  pour cut-out: 120.117,9.588 120.216,9.77 120.278,9.971 120.3,10.132 120.3,15.068 120.278,15.229 120.216,15.43 120.117,15.612 119.987,15.77 119.829,15.901 119.647,15.999 119.446,16.062 119.285,16.083 119.177,16.083 119.015,16.062 118.814,15.999 118.633,15.901 118.474,15.77 118.344,15.612 118.245,15.43 118.183,15.229 118.161,15.068 118.161,10.132 118.183,9.971 118.245,9.77 118.344,9.588 118.474,9.43 118.633,9.299 118.814,9.201 119.015,9.138 119.177,9.117 119.285,9.117 119.446,9.138 119.647,9.201 119.829,9.299 119.987,9.43
  pour cut-out: 99.294,10.652 99.469,10.94 99.615,11.244 99.732,11.564 99.818,11.898 99.871,12.244 99.889,12.511 99.889,12.689 99.871,12.956 99.818,13.302 99.732,13.636 99.615,13.956 99.469,14.26 99.294,14.548 99.093,14.816 98.869,15.063 98.621,15.288 98.353,15.488 98.066,15.663 97.761,15.81 97.441,15.927 97.108,16.013 96.762,16.065 96.495,16.083 96.317,16.083 96.05,16.065 95.704,16.013 95.37,15.927 95.05,15.81 94.745,15.663 94.458,15.488 94.19,15.288 93.942,15.063 93.718,14.816 93.517,14.548 93.343,14.26 93.196,13.956 93.079,13.636 92.993,13.302 92.94,12.956 92.922,12.689 92.922,12.511 92.94,12.244 92.993,11.898 93.079,11.564 93.196,11.244 93.343,10.94 93.517,10.652 93.718,10.384 93.942,10.137 94.19,9.912 94.458,9.712 94.745,9.537 95.05,9.39 95.37,9.273 95.704,9.187 96.05,9.135 96.317,9.117 96.495,9.117 96.762,9.135 97.108,9.187 97.441,9.273 97.761,9.39 98.066,9.537 98.353,9.712 98.621,9.912 98.869,10.137 99.093,10.384
  pour cut-out: 112.066,10.652 112.241,10.94 112.387,11.244 112.505,11.564 112.59,11.898 112.643,12.244 112.661,12.511 112.661,12.689 112.643,12.956 112.59,13.302 112.505,13.636 112.387,13.956 112.241,14.26 112.066,14.548 111.866,14.816 111.641,15.063 111.394,15.288 111.125,15.488 110.838,15.663 110.534,15.81 110.214,15.927 109.88,16.013 109.534,16.065 109.267,16.083 109.089,16.083 108.822,16.065 108.476,16.013 108.142,15.927 107.822,15.81 107.518,15.663 107.23,15.488 106.962,15.288 106.715,15.063 106.49,14.816 106.289,14.548 106.115,14.26 105.968,13.956 105.851,13.636 105.765,13.302 105.712,12.956 105.694,12.689 105.694,12.511 105.712,12.244 105.765,11.898 105.851,11.564 105.968,11.244 106.115,10.94 106.289,10.652 106.49,10.384 106.715,10.137 106.962,9.912 107.23,9.712 107.518,9.537 107.822,9.39 108.142,9.273 108.476,9.187 108.822,9.135 109.089,9.117 109.267,9.117 109.534,9.135 109.88,9.187 110.214,9.273 110.534,9.39 110.838,9.537 111.125,9.712 111.394,9.912 111.641,10.137 111.866,10.384
  pour cut-out: 3.5,1.5 1.45,1.5 1.45,2.925 3.5,2.925
  text "5V" at 3.5,1.5 h1.5

## Silkscreen, mask and mechanical layers (free items; w line width, h text height)
Top Overlay:
  drawing of 65 lines, arcs and shapes, not listed
  text "A" at 7.7,74.1 h0.8
  text "C" at 10.5,74.1 h0.8
  text "6.25U" at 79.063,13.9 h1.5
  text "7U" at 84.725,13.9 h1.5
  text "6.25U" at 179.075,13.9 h1.5
  text "7U" at 199.025,13.9 h1.5
  text "1.25U" at 8.948,5.902 h1.5
  text "1.5U" at 14.248,5.902 h1.5
  text "1.25U" at 33.26,5.902 h1.5
  text "1U" at 38.56,5.902 h1.5
  text "1.25U" at 56.572,5.902 h1.5
  text "1.5U" at 61.872,5.902 h1.5
  text "6.25U" at 129.069,5.902 h1.5
  text "7U" at 141.875,5.902 h1.5
  text "1.25U" at 200.507,5.902 h1.5
  text "1.5U" at 220.879,5.902 h1.5
  text "1.25U" at 225.379,5.902 h1.5
Bottom Overlay:
  circle w0.4: c276.219,39.385 r2.4
  circle w0.4: c276.219,54.625 r1.95
  circle w0.4: c252.419,39.385 r2.4
  circle w0.4: c252.419,54.625 r1.95
  circle w0.4: c265.604,45.25 r2.4
  circle w0.4: c280.844,45.25 r1.95
  circle w0.4: c265.604,69.05 r2.4
  circle w0.4: c280.844,69.05 r1.95
  circle w0.4: c254.8,77.485 r2.4
  circle w0.4: c254.8,92.725 r1.95
  circle w0.4: c278.6,77.485 r2.4
  circle w0.4: c278.6,92.725 r1.95
  circle w0.4: c33.331,20.335 r2.4
  circle w0.4: c33.331,35.575 r1.95
  circle w0.4: c9.531,20.335 r2.4
  circle w0.4: c9.531,35.575 r1.95
  circle w0.4: c200.025,17.765 r2.4
  circle w0.4: c200.025,2.525 r1.95
  circle w0.4: c180.975,17.765 r2.4
  circle w0.4: c180.975,2.525 r1.95
  circle w0.4: c80.963,2.525 r1.95
  circle w0.4: c80.963,17.765 r2.4
  circle w0.4: c85.725,2.525 r1.95
  circle w0.4: c85.725,17.765 r2.4
  region: 82.863,14.9 84.063,13.7 82.863,13.7
  region: 79.063,13.7 77.863,14.9 79.063,14.9
  region: 86.725,14.9 87.925,13.7 86.725,13.7
  region: 84.725,13.7 83.525,14.9 84.725,14.9
  region: 182.875,14.9 184.075,13.7 182.875,13.7
  region: 179.075,13.7 177.875,14.9 179.075,14.9
  region: 201.025,14.9 202.225,13.7 201.025,13.7
  region: 199.025,13.7 197.825,14.9 199.025,14.9
  region: 222.879,5.902 221.679,7.102 222.879,7.102
  region: 225.879,7.102 227.079,5.902 225.879,5.902
  region: 231.179,7.102 232.379,5.902 231.179,5.902
  region: 227.379,5.902 226.179,7.102 227.379,7.102
  region: 201.807,5.902 200.607,7.102 201.807,7.102
  region: 205.607,7.102 206.807,5.902 205.607,5.902
  region: 141.875,5.902 140.675,7.102 141.875,7.102
  region: 143.875,7.102 145.075,5.902 143.875,5.902
  region: 130.1,5.9 128.9,7.1 130.1,7.1
  region: 133.9,7.1 135.1,5.9 133.9,5.9
  region: 62.372,7.102 63.572,5.902 62.372,5.902
  region: 58.572,5.902 57.372,7.102 58.572,7.102
  region: 63.872,5.902 62.672,7.102 63.872,7.102
  region: 66.872,7.102 68.072,5.902 66.872,5.902
  region: 39.06,7.102 40.26,5.902 39.06,5.902
  region: 35.26,5.902 34.06,7.102 35.26,7.102
  region: 42.56,7.102 43.76,5.902 42.56,5.902
  region: 40.56,5.902 39.36,7.102 40.56,7.102
  region: 14.748,7.102 15.948,5.902 14.748,5.902
  region: 10.948,5.902 9.748,7.102 10.948,7.102
  region: 16.248,5.902 15.048,7.102 16.248,7.102
  region: 19.248,7.102 20.448,5.902 19.248,5.902
  text "6.25U" at 82.863,13.7 h1.5
  text "7U" at 86.725,13.7 h1.5
  text "6.25U" at 182.875,13.7 h1.5
  text "7U" at 201.025,13.7 h1.5
  text "1.25U" at 14.748,5.902 h1.5
  text "1.5U" at 19.248,5.902 h1.5
  text "1.25U" at 39.06,5.902 h1.5
  text "1U" at 42.56,5.902 h1.5
  text "1.25U" at 62.372,5.902 h1.5
  text "1.5U" at 66.872,5.902 h1.5
  text "7U" at 143.875,5.902 h1.5
  text "1.25U" at 205.607,5.902 h1.5
  text "1.5U" at 225.879,5.902 h1.5
  text "1.25U" at 231.179,5.902 h1.5
  text "6.25U" at 133.9,5.9 h1.5
Bottom Solder:
  text "MONO65_A2" at 303.75,93.75 h1.25 r90
Mechanical 80:
  text "CLOSED SOURCE" at 287.701,-90.328 h2
  text "A2" at 327.701,-91.328 h2
Mechanical 81:
  text "CLOSED SOURCE" at 21.701,-90.328 h2
  text "A2" at -20.599,-91.328 h2
Mechanical 100:
  drawing of 2797 lines, arcs and shapes, not listed
  text "NO  / HOLE" at 232.175,20.041 h1
  text "NO  / HOLE" at 98.85,19.863 h1
  text "NO  / HOLE" at 194.1,19.864 h1
  text "NO  / HOLE" at 60.699,19.736 h1

## Text inside footprints (layer, text, board x,y; h text height)
Designator8: Mechanical 80 "TOP SIDE" at 233.561,-83.328 h1.75; Mechanical 80 "www.aljaztitoric.com" at 201.701,-88.548 h1.5; Mechanical 80 "www.aljaztitoric.com" at 200.201,-85.048 h2; Mechanical 80 "VIEW SIDE:" at 232.291,-79.801 h1.14; Mechanical 80 "FILE NAME:" at 232.291,-95.168 h1.14; Mechanical 80 "TITLE:" at 270.391,-72.308 h1.14; Mechanical 80 "C" at -41.394,-2.026 h1.78; Mechanical 80 "8" at 325.178,173.183 h1.78; Mechanical 80 "REV:" at 323.731,-87.548 h1.14; Mechanical 80 "SCALE:" at 323.731,-95.168 h1.14; Mechanical 80 "8" at 325.178,-103.677 h1.78; Mechanical 80 "DATE:" at 232.291,-87.548 h1.14; Mechanical 80 "6" at 226.626,173.183 h1.78; Mechanical 80 "6" at 226.626,-103.677 h1.78; Mechanical 80 "5" at 177.604,173.183 h1.78; Mechanical 80 "5" at 177.604,-103.677 h1.78; Mechanical 80 "4" at 128.328,173.183 h1.78; Mechanical 80 "4" at 128.328,-103.677 h1.78; Mechanical 80 "2" at 29.776,173.183 h1.78; Mechanical 80 "2" at 29.776,-103.677 h1.78; Mechanical 80 "1" at -19.263,173.183 h1.78; Mechanical 80 "1" at -19.263,-103.677 h1.78; Mechanical 80 "A" at -41.394,139.198 h1.78; Mechanical 80 "B" at -41.394,68.586 h1.78; Mechanical 80 "D" at -41.394,-72.13 h1.78; Mechanical 80 "PCB DESIGNER:" at 232.291,-72.308 h1.14; Mechanical 80 "C" at 347.226,-2.026 h1.78; Mechanical 80 "A" at 347.226,139.198 h1.78; Mechanical 80 "B" at 347.226,68.586 h1.78; Mechanical 80 "D" at 347.226,-72.13 h1.78; Mechanical 80 "7" at 276.156,173.183 h1.78; Mechanical 80 "7" at 276.156,-103.677 h1.78; Mechanical 80 "3" at 79.036,173.183 h1.78; Mechanical 80 "3" at 79.036,-103.677 h1.78; Mechanical 80 "1:1 [A3]" at 327.701,-98.828 h2; Mechanical 81 "BOTTOM SIDE" at 73.541,-83.328 h1.75; Mechanical 81 "www.aljaztitoric.com" at 105.401,-88.548 h1.5; Mechanical 81 "www.aljaztitoric.com" at 106.901,-85.048 h2; Mechanical 81 "VIEW SIDE:" at 74.811,-79.801 h1.14; Mechanical 81 "FILE NAME:" at 74.811,-95.168 h1.14; Mechanical 81 "TITLE:" at 36.711,-72.308 h1.14; Mechanical 81 "C" at 348.496,-2.026 h1.78; Mechanical 81 "8" at -18.077,173.183 h1.78; Mechanical 81 "REV:" at -16.629,-87.548 h1.14; Mechanical 81 "SCALE:" at -16.629,-95.168 h1.14; Mechanical 81 "8" at -18.077,-103.677 h1.78; Mechanical 81 "DATE:" at 74.811,-87.548 h1.14; Mechanical 81 "6" at 80.475,173.183 h1.78; Mechanical 81 "6" at 80.475,-103.677 h1.78; Mechanical 81 "5" at 129.497,173.183 h1.78; Mechanical 81 "5" at 129.497,-103.677 h1.78; Mechanical 81 "4" at 178.773,173.183 h1.78; Mechanical 81 "4" at 178.773,-103.677 h1.78; Mechanical 81 "2" at 277.325,173.183 h1.78; Mechanical 81 "2" at 277.325,-103.677 h1.78; Mechanical 81 "1" at 326.364,173.183 h1.78; Mechanical 81 "1" at 326.364,-103.677 h1.78; Mechanical 81 "A" at 348.496,139.198 h1.78; Mechanical 81 "B" at 348.496,68.586 h1.78; Mechanical 81 "D" at 348.496,-72.13 h1.78; Mechanical 81 "PCB DESIGNER:" at 74.811,-72.308 h1.14; Mechanical 81 "C" at -40.124,-2.026 h1.78; Mechanical 81 "A" at -40.124,139.198 h1.78; Mechanical 81 "B" at -40.124,68.586 h1.78; Mechanical 81 "D" at -40.124,-72.13 h1.78; Mechanical 81 "7" at 30.945,173.183 h1.78; Mechanical 81 "7" at 30.945,-103.677 h1.78; Mechanical 81 "3" at 228.065,173.183 h1.78; Mechanical 81 "3" at 228.065,-103.677 h1.78; Mechanical 81 "1:1 [A3]" at -20.599,-98.828 h2
SW1: Top Assembly "NO" at 9.325,90.94 h0.5; Top Assembly "C" at 10.645,79.3 h0.5; Top Assembly "COM" at 2.625,88.4 h0.5; Top Assembly "A" at 8.105,79.3 h0.5
SW2: Top Assembly "NO" at 28.375,90.94 h0.5; Top Assembly "C" at 29.695,79.3 h0.5; Top Assembly "COM" at 21.675,88.4 h0.5; Top Assembly "A" at 27.155,79.3 h0.5
SW3: Top Assembly "NO" at 47.425,90.94 h0.5; Top Assembly "C" at 48.745,79.3 h0.5; Top Assembly "COM" at 40.725,88.4 h0.5; Top Assembly "A" at 46.205,79.3 h0.5
SW4: Top Assembly "NO" at 66.475,90.94 h0.5; Top Assembly "C" at 67.795,79.3 h0.5; Top Assembly "COM" at 59.775,88.4 h0.5; Top Assembly "A" at 65.255,79.3 h0.5
SW5: Top Assembly "NO" at 85.525,90.94 h0.5; Top Assembly "C" at 86.845,79.3 h0.5; Top Assembly "COM" at 78.825,88.4 h0.5; Top Assembly "A" at 84.305,79.3 h0.5
SW6: Top Assembly "NO" at 104.575,90.94 h0.5; Top Assembly "C" at 105.895,79.3 h0.5; Top Assembly "COM" at 97.875,88.4 h0.5; Top Assembly "A" at 103.355,79.3 h0.5
SW7: Top Assembly "NO" at 123.625,90.94 h0.5; Top Assembly "C" at 124.945,79.3 h0.5; Top Assembly "COM" at 116.925,88.4 h0.5; Top Assembly "A" at 122.405,79.3 h0.5
SW8: Top Assembly "NO" at 142.675,90.94 h0.5; Top Assembly "C" at 143.995,79.3 h0.5; Top Assembly "COM" at 135.975,88.4 h0.5; Top Assembly "A" at 141.455,79.3 h0.5
SW9: Top Assembly "NO" at 161.725,90.94 h0.5; Top Assembly "C" at 163.045,79.3 h0.5; Top Assembly "COM" at 155.025,88.4 h0.5; Top Assembly "A" at 160.505,79.3 h0.5
SW10: Top Assembly "NO" at 180.775,90.94 h0.5; Top Assembly "C" at 182.095,79.3 h0.5; Top Assembly "COM" at 174.075,88.4 h0.5; Top Assembly "A" at 179.555,79.3 h0.5
SW11: Top Assembly "NO" at 199.825,90.94 h0.5; Top Assembly "C" at 201.145,79.3 h0.5; Top Assembly "COM" at 193.125,88.4 h0.5; Top Assembly "A" at 198.605,79.3 h0.5
SW12: Top Assembly "NO" at 218.875,90.94 h0.5; Top Assembly "C" at 220.195,79.3 h0.5; Top Assembly "COM" at 212.175,88.4 h0.5; Top Assembly "A" at 217.655,79.3 h0.5
SW13: Top Assembly "NO" at 237.925,90.94 h0.5; Top Assembly "C" at 239.245,79.3 h0.5; Top Assembly "COM" at 231.225,88.4 h0.5; Top Assembly "A" at 236.705,79.3 h0.5
SW14: Top Assembly "NO" at 256.975,90.94 h0.5; Top Assembly "C" at 258.295,79.3 h0.5; Top Assembly "COM" at 250.275,88.4 h0.5; Top Assembly "A" at 255.755,79.3 h0.5
SW15: Top Assembly "NO" at 266.5,90.94 h0.5; Top Assembly "C" at 267.82,79.3 h0.5; Top Assembly "COM" at 259.8,88.4 h0.5; Top Assembly "A" at 265.28,79.3 h0.5
SW16: Top Assembly "NO" at 276.025,90.94 h0.5; Top Assembly "C" at 277.345,79.3 h0.5; Top Assembly "COM" at 269.325,88.4 h0.5; Top Assembly "A" at 274.805,79.3 h0.5
SW17: Top Assembly "NO" at 295.075,90.94 h0.5; Top Assembly "C" at 296.395,79.3 h0.5; Top Assembly "COM" at 288.375,88.4 h0.5; Top Assembly "A" at 293.855,79.3 h0.5
SW18: Top Assembly "NO" at 14.087,71.89 h0.5; Top Assembly "C" at 15.407,60.25 h0.5; Top Assembly "COM" at 7.387,69.35 h0.5; Top Assembly "A" at 12.867,60.25 h0.5
SW19: Top Assembly "NO" at 37.9,71.89 h0.5; Top Assembly "C" at 39.22,60.25 h0.5; Top Assembly "COM" at 31.2,69.35 h0.5; Top Assembly "A" at 36.68,60.25 h0.5
SW20: Top Assembly "NO" at 56.95,71.89 h0.5; Top Assembly "C" at 58.27,60.25 h0.5; Top Assembly "COM" at 50.25,69.35 h0.5; Top Assembly "A" at 55.73,60.25 h0.5
SW21: Top Assembly "NO" at 76,71.89 h0.5; Top Assembly "C" at 77.32,60.25 h0.5; Top Assembly "COM" at 69.3,69.35 h0.5; Top Assembly "A" at 74.78,60.25 h0.5
SW22: Top Assembly "NO" at 95.05,71.89 h0.5; Top Assembly "C" at 96.37,60.25 h0.5; Top Assembly "COM" at 88.35,69.35 h0.5; Top Assembly "A" at 93.83,60.25 h0.5
SW23: Top Assembly "NO" at 114.1,71.89 h0.5; Top Assembly "C" at 115.42,60.25 h0.5; Top Assembly "COM" at 107.4,69.35 h0.5; Top Assembly "A" at 112.88,60.25 h0.5
SW24: Top Assembly "NO" at 133.15,71.89 h0.5; Top Assembly "C" at 134.47,60.25 h0.5; Top Assembly "COM" at 126.45,69.35 h0.5; Top Assembly "A" at 131.93,60.25 h0.5
SW25: Top Assembly "NO" at 152.2,71.89 h0.5; Top Assembly "C" at 153.52,60.25 h0.5; Top Assembly "COM" at 145.5,69.35 h0.5; Top Assembly "A" at 150.98,60.25 h0.5
SW26: Top Assembly "NO" at 171.25,71.89 h0.5; Top Assembly "C" at 172.57,60.25 h0.5; Top Assembly "COM" at 164.55,69.35 h0.5; Top Assembly "A" at 170.03,60.25 h0.5
SW27: Top Assembly "NO" at 190.3,71.89 h0.5; Top Assembly "C" at 191.62,60.25 h0.5; Top Assembly "COM" at 183.6,69.35 h0.5; Top Assembly "A" at 189.08,60.25 h0.5
SW28: Top Assembly "NO" at 209.35,71.89 h0.5; Top Assembly "C" at 210.67,60.25 h0.5; Top Assembly "COM" at 202.65,69.35 h0.5; Top Assembly "A" at 208.13,60.25 h0.5
SW29: Top Assembly "NO" at 228.4,71.89 h0.5; Top Assembly "C" at 229.72,60.25 h0.5; Top Assembly "COM" at 221.7,69.35 h0.5; Top Assembly "A" at 227.18,60.25 h0.5
SW30: Top Assembly "NO" at 247.45,71.89 h0.5; Top Assembly "C" at 248.77,60.25 h0.5; Top Assembly "COM" at 240.75,69.35 h0.5; Top Assembly "A" at 246.23,60.25 h0.5
SW31: Top Assembly "NO" at 271.262,71.89 h0.5; Top Assembly "C" at 272.582,60.25 h0.5; Top Assembly "COM" at 264.562,69.35 h0.5; Top Assembly "A" at 270.042,60.25 h0.5
SW32: Top Assembly "NO" at 295.075,71.89 h0.5; Top Assembly "C" at 296.395,60.25 h0.5; Top Assembly "COM" at 288.375,69.35 h0.5; Top Assembly "A" at 293.855,60.25 h0.5
SW33: Top Assembly "NO" at 11.706,52.84 h0.5; Top Assembly "C" at 13.026,41.2 h0.5; Top Assembly "COM" at 5.007,50.3 h0.5; Top Assembly "A" at 10.486,41.2 h0.5
SW34: Top Assembly "NO" at 16.469,52.84 h0.5; Top Assembly "C" at 17.789,41.2 h0.5; Top Assembly "COM" at 9.77,50.3 h0.5; Top Assembly "A" at 15.249,41.2 h0.5
SW35: Top Assembly "NO" at 42.663,52.84 h0.5; Top Assembly "C" at 43.983,41.2 h0.5; Top Assembly "COM" at 35.963,50.3 h0.5; Top Assembly "A" at 41.443,41.2 h0.5
SW36: Top Assembly "NO" at 61.713,52.84 h0.5; Top Assembly "C" at 63.033,41.2 h0.5; Top Assembly "COM" at 55.013,50.3 h0.5; Top Assembly "A" at 60.493,41.2 h0.5
SW37: Top Assembly "NO" at 80.763,52.84 h0.5; Top Assembly "C" at 82.083,41.2 h0.5; Top Assembly "COM" at 74.063,50.3 h0.5; Top Assembly "A" at 79.543,41.2 h0.5
SW38: Top Assembly "NO" at 99.813,52.84 h0.5; Top Assembly "C" at 101.133,41.2 h0.5; Top Assembly "COM" at 93.113,50.3 h0.5; Top Assembly "A" at 98.593,41.2 h0.5
SW39: Top Assembly "NO" at 118.863,52.84 h0.5; Top Assembly "C" at 120.183,41.2 h0.5; Top Assembly "COM" at 112.163,50.3 h0.5; Top Assembly "A" at 117.643,41.2 h0.5
SW40: Top Assembly "NO" at 137.913,52.84 h0.5; Top Assembly "C" at 139.233,41.2 h0.5; Top Assembly "COM" at 131.213,50.3 h0.5; Top Assembly "A" at 136.693,41.2 h0.5
SW41: Top Assembly "NO" at 156.963,52.84 h0.5; Top Assembly "C" at 158.283,41.2 h0.5; Top Assembly "COM" at 150.263,50.3 h0.5; Top Assembly "A" at 155.743,41.2 h0.5
SW42: Top Assembly "NO" at 176.013,52.84 h0.5; Top Assembly "C" at 177.333,41.2 h0.5; Top Assembly "COM" at 169.313,50.3 h0.5; Top Assembly "A" at 174.793,41.2 h0.5
SW43: Top Assembly "NO" at 195.063,52.84 h0.5; Top Assembly "C" at 196.383,41.2 h0.5; Top Assembly "COM" at 188.363,50.3 h0.5; Top Assembly "A" at 193.843,41.2 h0.5
SW44: Top Assembly "NO" at 214.113,52.84 h0.5; Top Assembly "C" at 215.433,41.2 h0.5; Top Assembly "COM" at 207.413,50.3 h0.5; Top Assembly "A" at 212.893,41.2 h0.5
SW45: Top Assembly "NO" at 233.163,52.84 h0.5; Top Assembly "C" at 234.483,41.2 h0.5; Top Assembly "COM" at 226.463,50.3 h0.5; Top Assembly "A" at 231.943,41.2 h0.5
SW46: Top Assembly "NO" at 252.213,52.84 h0.5; Top Assembly "C" at 253.533,41.2 h0.5; Top Assembly "COM" at 245.513,50.3 h0.5; Top Assembly "A" at 250.993,41.2 h0.5
SW47: Top Assembly "NO" at 264.119,52.84 h0.5; Top Assembly "C" at 265.439,41.2 h0.5; Top Assembly "COM" at 257.419,50.3 h0.5; Top Assembly "A" at 262.899,41.2 h0.5
SW48: Top Assembly "NO" at 279.059,57.35 h0.5 r270; Top Assembly "C" at 267.419,56.03 h0.5 r270; Top Assembly "COM" at 276.519,64.05 h0.5 r270; Top Assembly "A" at 267.419,58.57 h0.5 r270
SW49: Top Assembly "NO" at 295.075,52.84 h0.5; Top Assembly "C" at 296.395,41.2 h0.5; Top Assembly "COM" at 288.375,50.3 h0.5; Top Assembly "A" at 293.855,41.2 h0.5
SW50: Top Assembly "NO" at 11.707,33.79 h0.5; Top Assembly "C" at 13.027,22.15 h0.5; Top Assembly "COM" at 5.007,31.25 h0.5; Top Assembly "A" at 10.487,22.15 h0.5
SW51: Top Assembly "NO" at 21.232,33.79 h0.5; Top Assembly "C" at 22.552,22.15 h0.5; Top Assembly "COM" at 14.532,31.25 h0.5; Top Assembly "A" at 20.012,22.15 h0.5
SW52: Top Assembly "NO" at 33.138,33.79 h0.5; Top Assembly "C" at 34.458,22.15 h0.5; Top Assembly "COM" at 26.438,31.25 h0.5; Top Assembly "A" at 31.918,22.15 h0.5
SW53: Top Assembly "NO" at 52.188,33.79 h0.5; Top Assembly "C" at 53.508,22.15 h0.5; Top Assembly "COM" at 45.488,31.25 h0.5; Top Assembly "A" at 50.968,22.15 h0.5
SW54: Top Assembly "NO" at 71.238,33.79 h0.5; Top Assembly "C" at 72.558,22.15 h0.5; Top Assembly "COM" at 64.538,31.25 h0.5; Top Assembly "A" at 70.018,22.15 h0.5
SW55: Top Assembly "NO" at 90.288,33.79 h0.5; Top Assembly "C" at 91.608,22.15 h0.5; Top Assembly "COM" at 83.588,31.25 h0.5; Top Assembly "A" at 89.068,22.15 h0.5
SW56: Top Assembly "NO" at 109.338,33.79 h0.5; Top Assembly "C" at 110.658,22.15 h0.5; Top Assembly "COM" at 102.638,31.25 h0.5; Top Assembly "A" at 108.118,22.15 h0.5
SW57: Top Assembly "NO" at 128.388,33.79 h0.5; Top Assembly "C" at 129.708,22.15 h0.5; Top Assembly "COM" at 121.688,31.25 h0.5; Top Assembly "A" at 127.168,22.15 h0.5
SW58: Top Assembly "NO" at 147.438,33.79 h0.5; Top Assembly "C" at 148.758,22.15 h0.5; Top Assembly "COM" at 140.738,31.25 h0.5; Top Assembly "A" at 146.218,22.15 h0.5